# Altium PCB ads1299.PcbDoc (part 2 of 2)
Units mil, origin at the board's own origin, x right, y up, seen from the top; angles counter-clockwise.
Board outline 3937.01 x 3937.01 mil, 4 copper layers (Top Layer, internal_Layer 1, Internal_Layer 2, Bottom Layer), stack 23.756 mil thick; 175 components, 124 nets, 575 pads, 101 vias.
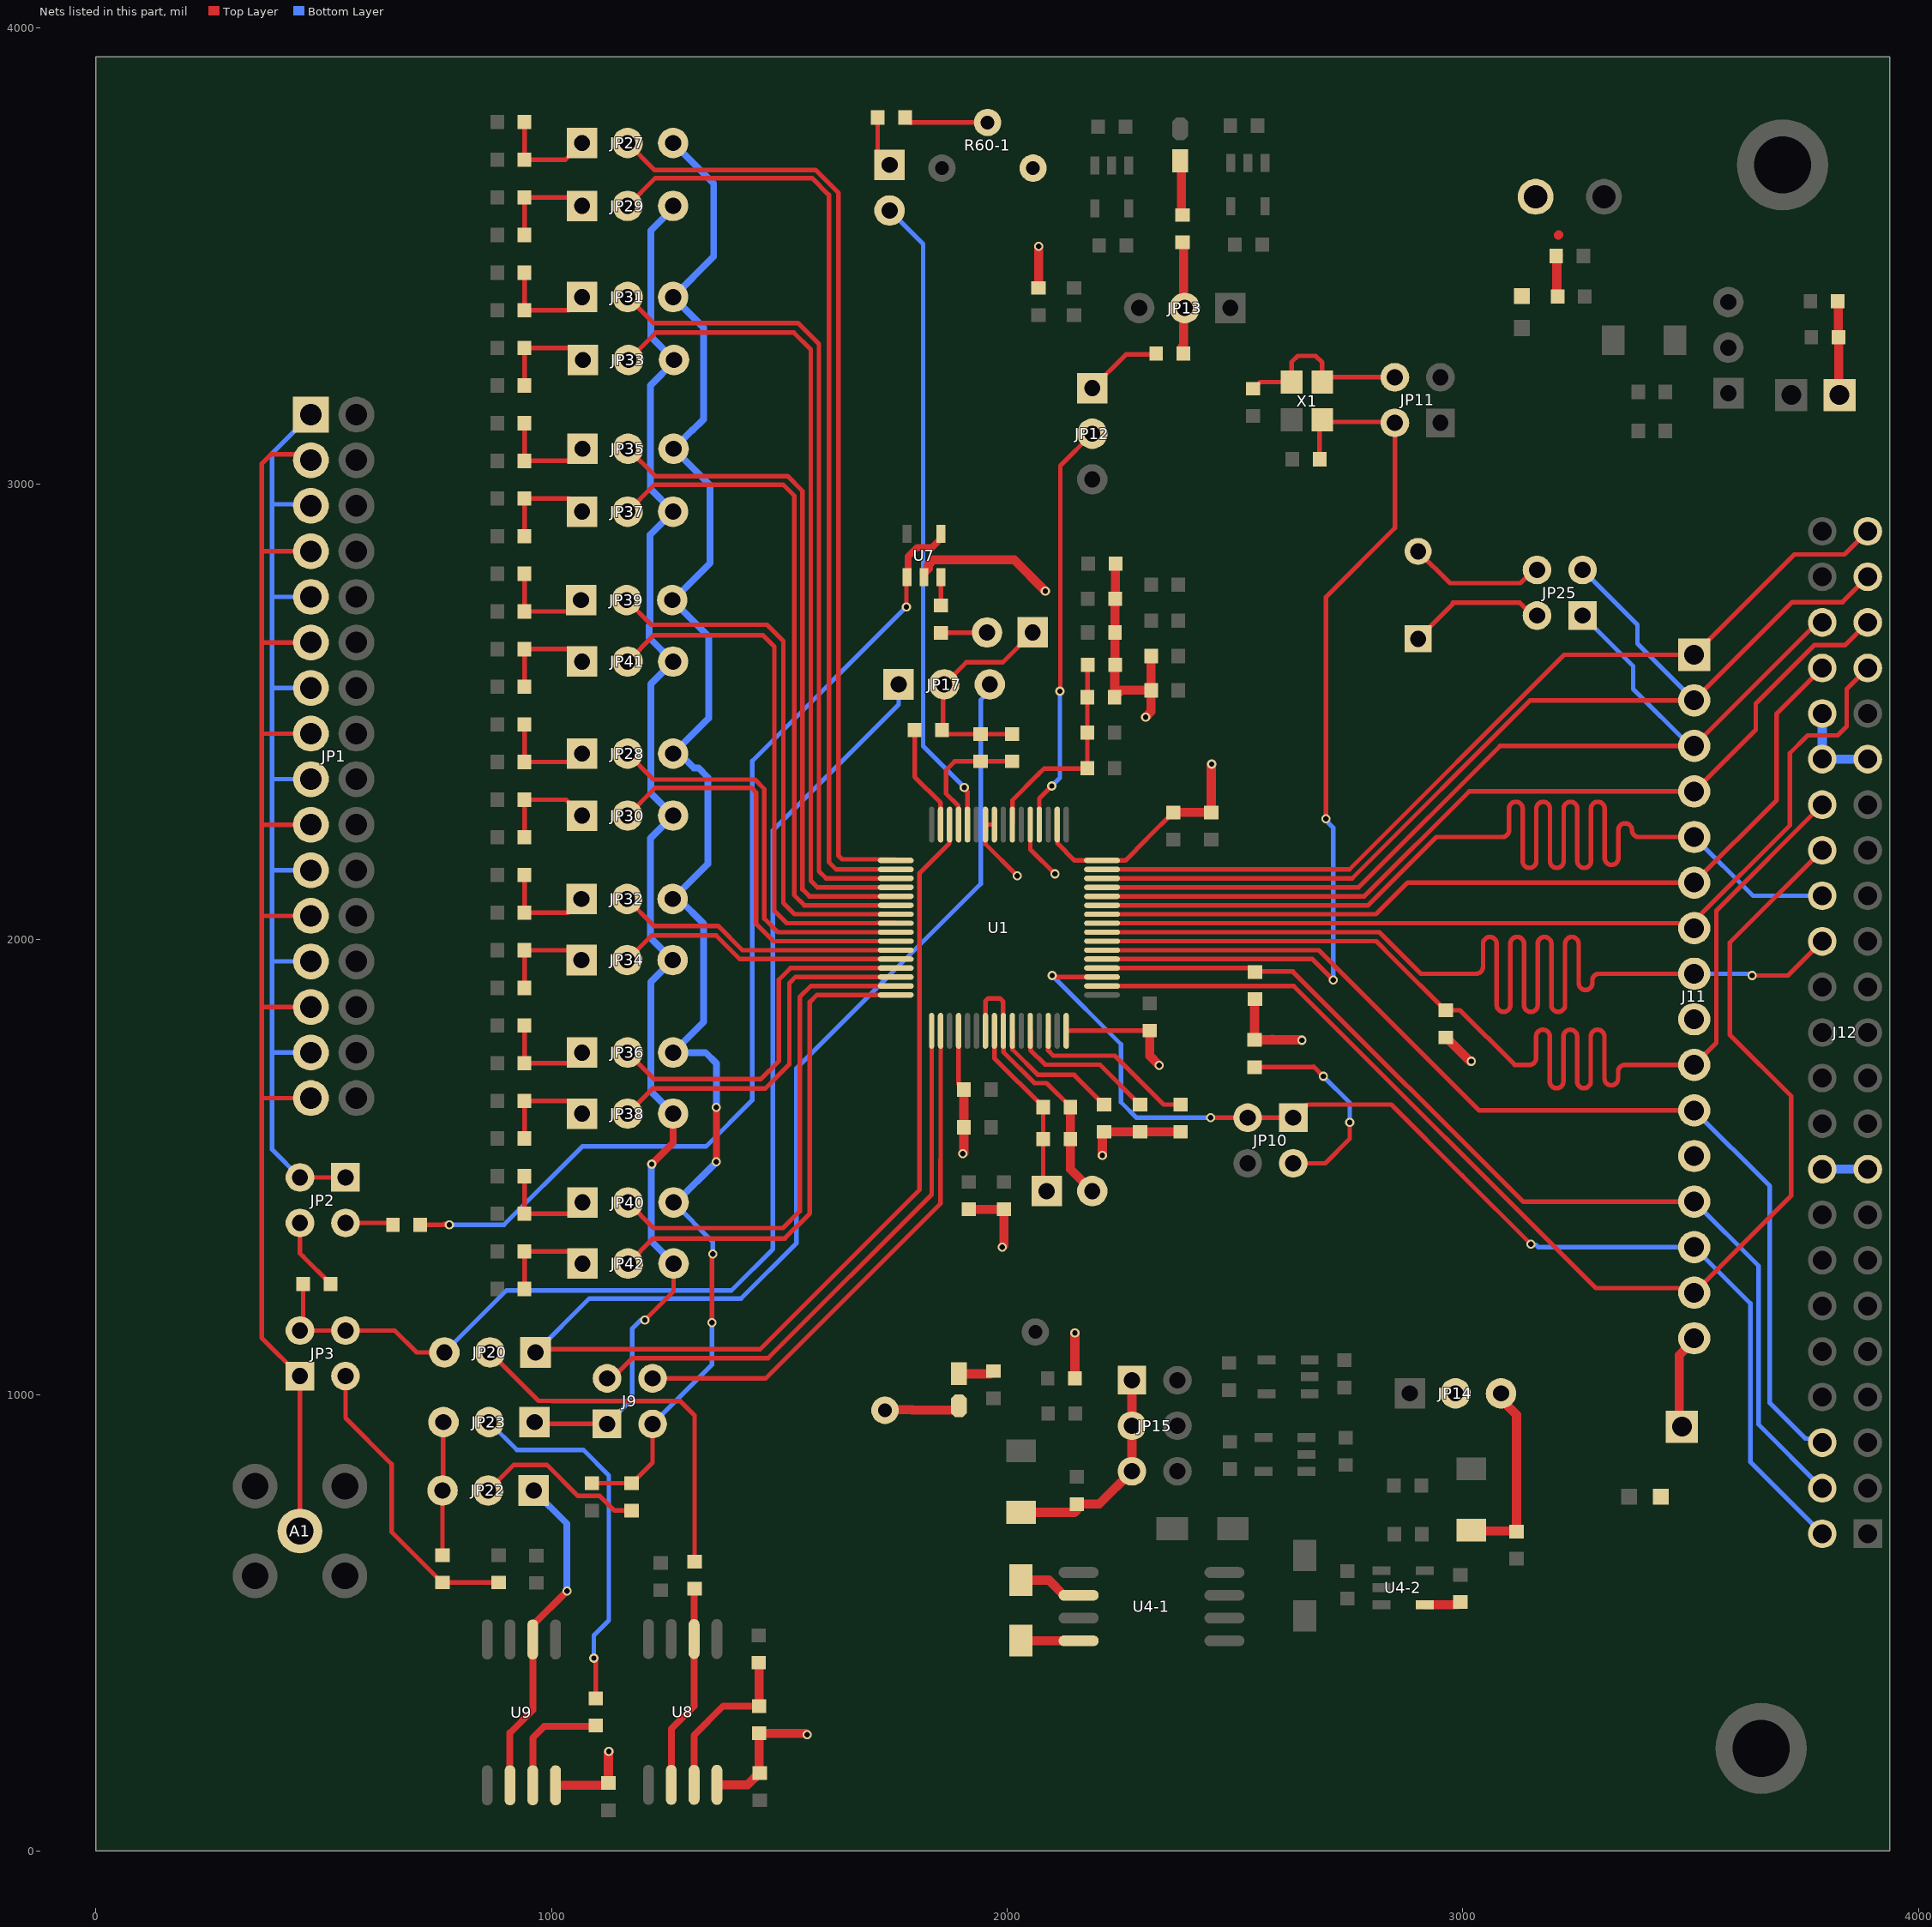
[diagram p4: the nets of this part, all layers, seen from the top]

## Via types
v1: diameter 20, hole 12, Top Layer to Bottom Layer, tented both sides, 86 vias
v2: diameter 20, hole 12, Top Layer to Bottom Layer, 15 vias

## Nets (pads, with @x,y where several pads share a name; then routed paths per layer and width w, separated by ;. In a path a pad name is that pad's centre, name@x,y a point inside that pad or via, vN(x,y) a via of type N, cw(c..) or ccw(c..) an arc to the next point about the centre after c; other vN are vias at no path point) (continued)
AVSS: C18.1 C19-1.1 C19-2.1 C21-1.1 C21-2.1 C23.1 C24.2 C25.1 C26.1 C28.1 C30.1 C32.2 C33.2 C53-1.1 C53-2.1 C55-3.2 C55-4.2 C56-1.1 C56-2.1 C62-2.1 C63-2.1 D2.K JP14.2 R60-1.3 R62-2.1 TP1.2 TP3.1 U1.20 U1.23 U1.25 U1.32 U1.53 U1.57 U1.58 U7.2 U8.4 U9.4 | length 3516.2
  Top Layer w10: U1.20@1893.42,1799.63 1893.42,1683.45 1905.08,1671.79 C19-1.1@1905.08,1671 ; U1.23@1952.47,1799.63 1952.47,1864.47 1959,1871 1984,1871 1991.49,1863.51 1991.49,1799.98 U1.25@1991.84,1799.63 1992.19,1799.28 1992.19,1753 2060.18,1685 2086.71,1685 2138.92,1632.79 C25.1@2138.92,1632 ; U1.57@1972.16,2252.37 U1.58@1952.47,2252.37 1952.56,2252.28 1952.56,2209.44 v1(2022,2140) ; U1.53@2050.9,2252.37 2050.9,2198.1 v1(2105,2144) ; U1.32@2129.64,1799.63 2140.32,1799.63 2140.84,1800.16 C33.2@2313,1800.16
  Top Layer w20: U9.4@1009,144 C62-2.1@1125.88,144 ; C62-2.1@1125,148.92 1125,217 v1(1126,218) ; U8.4@1363,145 1430.29,145 1456.21,170.92 C18.1@1457,170.92 ; 1455.5,187.42 1455.5,257.58 R62-2.1@1456,258.08 1557.92,258.08 v1(1561,255) ; TP3.1@1715,968 1791.65,968 1792,967.65 1886.76,967.65 1894.26,975.15 D2.K@1894.26,977 ; U7.2@1817.76,2805.2 1827.16,2814.6 1827.16,2822.65 1837.99,2833.48 2015.52,2833.48 v1(2084,2765) ; v1(1903,1530) 1905.08,1532.08 C19-2.1@1905.08,1588 C19-1.1@1905.08,1671 ; C21-1.1@1916,1408.08 C21-2.1@1993,1408.08 1993,1329 v1(1989,1325) ; C53-2.1@2069,3429.92 v1(2069,3521) ; C25.1@2138.92,1632 C24.2@2138.92,1562 2138.92,1496.08 TP1.2@2187,1448 ; C23.1@2148.92,1037 v1(2148.92,1136.92) ; v1(2209.15,1526.06) 2209.15,1574.23 C26.1@2213,1578.08 C28.1@2292,1578.08 C30.1@2381,1578.08 ; C55-4.2@2235.92,2532 2235.92,2532.79 C55-4.2@2236.42,2533.29 ; C56-1.1@2237.92,2825.79 C56-1.1@2237.92,2825 2237.42,2824.5 2237.42,2748.5 C56-2.1@2236.92,2748 C56-2.1@2236.92,2748 2236.88,2674.04 C53-1.1@2236.84,2674 2236.88,2673.96 C55-3.2@2236.92,2603 2236.42,2602.58 C55-4.2@2236.42,2533.29 ; v1(2304,2488) 2316.08,2500.08 C63-2.1@2316.08,2547 ; C33.2@2313,1800.16 2313,1745 v1(2334,1724) ; C32.2@2314.58,2623.5 C32.2@2316.08,2622 C63-2.1@2316.08,2547 ; C55-4.2@2236.42,2533.29 2240.88,2537.75 2241.67,2537.75 2250.92,2547 C63-2.1@2316.08,2547
BIAS: JP2.4 R62.1 | length 168.1
  Top Layer w10: JP2.4@443.46,1373.46 JP2.4@448,1378 448,1311.69 455.54,1304.15 514.92,1244.79 R62.1@514.92,1244
BIAS_DRV: C61.1 JP17.2 JP18.1 R61.2 R63-2.2 | length 501.2
  Top Layer w10: C61.1@2011,2450.92 R61.2@1942,2450.92 1866,2450.92 R63-2.2@1856.92,2460 1859.46,2462.54 1859.46,2557.46 JP17.2@1862,2560 1910.46,2608.46 1990.46,2608.46 JP18.1@2056,2674
BIAS_ELEC: JP3.2 JP3.4 JP17.1 JP20.3 R62.2 | length 2634.5
  Top Layer w10: R62.2@455.08,1244 455.08,1149.08 JP3.2@448,1142 JP3.4@548,1142 ; JP3.4@548,1156.34 JP3.4@548,1142 ; JP20.3@765,1094 704,1094 656,1142 JP3.4@548,1142
  Bottom Layer w10: JP20.3@765,1104 JP20.3@765,1094 901,1230 1395,1230 1486,1321 1486,2240.16 1762,2516.16 JP17.1@1762,2560
BIAS_SHD: R63.2 U7.1 U7.4 | length 2278.5
  Top Layer w10: R63.2@710.96,1373.04 R63.2@711.92,1374 763,1374 765,1376 765.09,1375.91 774.09,1375.91 v2(776,1374) ; v1(1779,2730) 1779,2794.32 U7.1@1780.2,2795.51
  Top Layer w15: U7.1@1780.2,2795.51 1782.54,2797.85 1782.54,2840.89 1802.14,2860.5 1835.34,2860.5 1852.66,2877.81 1852.66,2887.66 U7.4@1855,2890
  Bottom Layer w10: v2(776,1374) 895.85,1374 1067.85,1546 1339,1546 1441,1648 1441,2392 v1(1779,2730)
BIASIN: JP17.3 JP20.1 U1.62 | length 3893.5
  Top Layer w10: JP20.1@965,1094 972,1101 1458,1101 1808,1451 1808,2146.12 1872.96,2211.07 1872.96,2216.85 1873.38,2217.28 1873.38,2252.02 U1.62@1873.73,2252.37
  Bottom Layer w10: JP20.1@965,1094 1083,1212 1416,1212 1537.86,1333.86 1537.86,1717.86 1942,2122 1942,2525.68 1962,2545.68 JP17.3@1962,2560
BIASINV: C61.2 R61.1 U1.61 | length 283.9
  Top Layer w10: U1.61@1893.42,2252.37 1893.07,2252.72 1893.07,2287.46 1892.64,2287.9 1892.64,2293.67 1866,2320.3 1866,2372 1885.08,2391.08 R61.1@1942,2391.08 C61.2@2011,2391.08
BIASOUT: R63-2.1 U1.63 | length 231.2
  Top Layer w10: R63-2.1@1797.08,2460 1797.08,2356.92 1854.04,2299.96 U1.63@1854.05,2252.37
BIASREF: J16.2 U1.60 | length 1418.5
  Top Layer w10: v1(1906,2334) 1906,2331.29 1913.1,2324.19 U1.60@1913.1,2252.37
  Bottom Layer w10: J16.2@1742,3600 1815.54,3526.46 1815.54,2424.46 v1(1906,2334)
CLK: C37.2 JP11.2 U1.37 X1.3 | length 2044.3
  Top Layer w10: U1.37@2208.37,1957.1 2669.9,1957.1 v1(2716,1911) ; C37.2@2685.92,3054 2685.92,3135.12 X1.3@2691.46,3140.66 2696.13,3136 JP11.2@2826,3136 ; v1(2700,2265) 2700,2752.08 2851,2903.08 JP11.2@2851,3134
  Bottom Layer w10: v1(2700,2265) 2700,2262.29 2705,2257.29 2705,2256 2716,2245 v1(2716,1911)
CLKSEL: JP12.2 U1.52 | length 919.3
  Top Layer w10: U1.52@2070.58,2252.37 2070.58,2309.58 v1(2098,2337) ; v1(2116,2545) 2117,2546 2117,3040 JP12.2@2187,3110 ; JP12.2@2195,3090 JP12.2@2204.5,3099.5
  Bottom Layer w10: v1(2098,2337) 2116,2355 v1(2116,2545)
CS#: J11.10 J12.33 R39.2 U1.39 | length 2775
  Top Layer w10: U1.39@2208.37,1996.47 2809.99,1996.47 2848.1,1958.36 R39.2@2961.87,1844.58 ; R39.2@2963,1844.92 2994.08,1844.92 3114,1725 3141,1725 3146,1725 ccw(c3146,1740) 3161,1740 3161,1787.2 cw(c3176,1787.2) 3191,1787.2 3191,1688.8 ccw(c3206,1688.8) 3221,1688.8 3221,1787.2 cw(c3236,1787.2) 3251,1787.2 3251,1688.8 ccw(c3266,1688.8) 3281,1688.8 3281,1787.2 cw(c3296,1787.2) 3311,1787.2 3311,1695.08 ccw(c3326,1695.08) 3341,1695.08 3341,1710 cw(c3356,1710) 3356,1725 3413,1725 J11.10@3508,1725 ; J11.10@3519,1725 3519,1736 3556.43,1773.43 3556.43,2063.43 J12.33@3789,2296
  Bottom Layer w10: J12.33@3779.58,2286.58 J12.33@3789,2296
DAISY_IN: J11.7 J12.40 U1.41 | length 2071.6
  Top Layer w10: U1.41@2208.37,2035.84 3497.16,2035.84 J11.7@3508,2025 3508,2040.46 3718,2250.46 3718,2409 3757,2448 3823,2448 3842.81,2467.81 3842.81,2549.81 J12.40@3889,2596
DGND: C0-5.1 C0-6.1 J11.16 J12.17 J12.18 J12.35 J12.36 J12.37 J13-1.1 J13-2.1 L3.2 | length 730.9
  Top Layer w20: J13-2.1@3481,931 3475,937 3475,1087.85 3508,1120.85 J11.16@3508,1125 ; C0-5.1@3823,3401 3823.96,3400.04 3823.96,3322.96 C0-6.1@3824.92,3322 3824.92,3197.08 J13-1.1@3827,3195
  Bottom Layer w20: J13-2.1@3480,932 J13-2.1@3481,931 ; J12.17@3789,1484.37 J12.17@3789,1496 J12.18@3889,1496 ; J12.37@3789,2496 J12.35@3789,2396 J12.36@3889,2396
DIN: J11.15 J12.31 U1.34 | length 2777.6
  Top Layer w10: U1.34@2208.37,1898.05 2327.07,1898.05 ; 2327.08,1898.04 2628.96,1898.04 3292,1235 3498,1235 J11.15@3508,1225 3721,1438 3721,1656.21 3586,1791.21 3586,1993 J12.31@3789,2196
DOUT: J11.5 J12.29 U1.43 | length 2776
  Top Layer w10: U1.43@2208.37,2075.21 2792.21,2075.21 2942,2225 3081.5,2225 3086.5,2225 ccw(c3086.5,2240) 3101.5,2240 3101.5,2287.37 cw(c3116.5,2287.37) 3131.5,2287.37 3131.5,2172.07 ccw(c3146.5,2172.07) 3161.5,2172.07 3161.5,2287.37 cw(c3176.5,2287.37) 3191.5,2287.37 3191.5,2172.07 ccw(c3206.5,2172.07) 3221.5,2172.07 3221.5,2287.37 cw(c3236.5,2287.37) 3251.5,2287.37 3251.5,2172.07 ccw(c3266.5,2172.07) 3281.5,2172.07 3281.5,2287.37 cw(c3296.5,2287.37) 3311.5,2287.37 3311.5,2178.94 ccw(c3326.5,2178.94) 3341.5,2178.94 3341.5,2240 cw(c3356.5,2240) 3371.5,2240 ccw(c3386.5,2240) 3386.5,2225 3436,2225 J11.5@3508,2225
  Bottom Layer w10: J11.5@3508,2225 3637,2096 J12.29@3789,2096
DRDY#: J11.1 J12.46 U1.47 | length 1988
  Top Layer w10: U1.47@2208.37,2153.95 2751.49,2153.95 3222.54,2625 J11.1@3508,2625 3728,2845 3838,2845 J12.46@3889,2896
DVDD: C48-1.2 C49-1.2 J11.9 J11.12 JP13.2 R35.1 R36.2 R39.1 R48.2 R52.2 U1.48 U1.50 | length 1047.4
  Top Layer w10: U1.50@2109.95,2252.37 2110.3,2252.02 2110.3,2211.51 2148.17,2173.64 U1.48@2208.37,2173.64 2259.72,2173.64 2306.99,2220.91 2306.99,2221.69 2364.21,2278.92 C48-1.2@2365,2278.92
  Top Layer w20: C48-1.2@2365,2278.92 C49-1.2@2448,2278.92 2448,2384 v1(2449,2385) ; 2384.92,3302 2387.46,3304.54 2387.46,3383.46 JP13.2@2390,3386 2387.5,3388.5 2387.5,3527.66 R48.2@2385,3530.16 ; R36.2@2543,1868.08 R35.1@2543,1779.92 v1@2646.08,1779.92 ; 2582.08,1780.92 2583,1780 ; R39.1@2963,1785.08 2963.79,1785.08 3015.87,1733 v1(3019,1733)
  other v1: 2647,1779
GND_EXT: C0-3.1 C0-4.1 L2.1 Power.2 | length 95.9
  Top Layer w20: L2.1@3130,3412 L2.1@3130.5,3411.5 ; C0-4.1@3208.08,3411 3206.58,3412.5 3206.58,3499.29 C0-3.1@3210.04,3502.75 ; 3210.04,3545.75 3211,3546.71
GPIO1: J11.6 J12.39 U1.42 | length 1915.4
  Top Layer w10: U1.42@2208.77,2055.53 2809.53,2055.53 2879,2125 J11.6@3508,2125 3689,2306 3689,2496 J12.39@3789,2596
GPIO2: J11.4 J12.42 U1.44 | length 1963.6
  Top Layer w10: U1.44@2208.37,2094.9 2783.9,2094.9 3014,2325 J11.4@3508,2325 3643,2460 3643,2518 3771,2646 3839,2646 J12.42@3889,2696
GPIO3: J11.3 J12.41 JP25.1 U1.45 | length 2214.2
  Top Layer w10: U1.45@2208.37,2114.58 2771.58,2114.58 3082,2425 J11.3@3508,2425 3779,2696 J12.41@3789,2696
  Bottom Layer w10: JP25.1@3263,2711 3374,2600 3374,2550 3499,2425 J11.3@3508,2425
GPIO4: J11.2 J12.44 JP25.3 U1.46 | length 2342.2
  Top Layer w10: U1.46@2208.37,2134.27 2757.26,2134.27 3147.99,2525 J11.2@3508,2525 3723.5,2740.5 3833.5,2740.5 J12.44@3889,2796
  Bottom Layer w10: JP25.3@3263,2811 3383.32,2690.68 3383.32,2649.68 J11.2@3508,2525
IN1_N: JP40.2 U1.15 | length 1106.1
  Top Layer w10: JP40.2@1168,1423 1224,1367 1508,1367 1545,1404 1545,1874 1569.05,1898.05 U1.15@1755.63,1898.05
IN1_P: JP42.2 U1.16 | length 1103.6
  Top Layer w10: JP42.2@1168,1289 1223,1344 1512,1344 1567,1399 1567,1863 1582.36,1878.36 U1.16@1755.63,1878.36
IN2_N: JP36.2 U1.13 | length 818.3
  Top Layer w10: JP36.2@1167,1752 1225,1694 1460,1694 1499,1733 1499,1912 1524.42,1937.42 U1.13@1755.63,1937.42
IN2_P: JP38.2 U1.14 | length 817.3
  Top Layer w10: JP38.2@1167,1618 1222,1673 1469,1673 1522,1726 1522,1904.42 1535.31,1917.73 U1.14@1755.63,1917.73
IN3_N: JP32.2 U1.11 | length 636.1
  Top Layer w10: JP32.2@1166,2089 1225,2030 1365.92,2030 1419.13,1976.79 U1.11@1755.63,1976.79
IN3_P: JP34.2 U1.12 | length 633.5
  Top Layer w10: JP34.2@1166,1955 1220,2009 1361.47,2009 1413.37,1957.1 U1.12@1755.63,1957.1
IN4_N: JP28.2 U1.9 | length 917.6
  Top Layer w10: JP28.2@1167,2408 1224,2351 1446.46,2351 1467,2330.46 1467,2046 1496.84,2016.16 U1.9@1755.63,2016.16
IN4_P: JP30.2 U1.10 | length 922
  Top Layer w10: JP30.2@1167,2272 1228,2333 1439,2333 1449,2323 1449,2035 1487.53,1996.47 U1.10@1755.63,1996.47
IN5_N: JP39.2 U1.7 | length 1213
  Top Layer w10: JP39.2@1165,2745 1219,2691 1473,2691 1509,2655 1509,2080 1533.47,2055.53 U1.7@1755.63,2055.53
IN5_P: JP41.2 U1.8 | length 1254.9
  Top Layer w10: JP41.2@1167,2610 1225,2668 1464,2668 1489,2643 1489,2063 1516.16,2035.84 1715.62,2035.84 U1.8@1755.63,2035.84 1755.28,2036.19 1715.62,2036.19 1715.26,2036.55
IN6_N: JP35.2 U1.5 | length 1506.4
  Top Layer w10: JP35.2@1168,3077 1228,3017 1518,3017 1551,2984 1551,2110 1566,2095 1755.53,2095 U1.5@1755.63,2094.9
IN6_P: JP37.2 U1.6 | length 1509
  Top Layer w10: JP37.2@1167,2939 1226,2998 1509,2998 1533,2974 1533,2097 1554.79,2075.21 U1.6@1755.63,2075.21
IN7_N: JP31.2 U1.3 | length 1794.8
  Top Layer w10: JP31.2@1167,3410 1224,3353 1541,3353 1587,3307 1587,2150 1602.73,2134.27 U1.3@1755.63,2134.27
IN7_P: JP33.2 U1.4 | length 1798.8
  Top Layer w10: JP33.2@1169,3272 1229,3332 1532,3332 1569,3295 1569,2129 1583.42,2114.58 U1.4@1755.63,2114.58
IN8_N: JP27.2 U1.1 | length 2092.8
  Top Layer w10: JP27.2@1167,3748 1226,3689 1579.46,3689 1630,3638.46 1630,2184 1638,2176 1753.27,2176 U1.1@1755.63,2173.64
IN8_P: JP29.2 U1.2 | length 2099.9
  Top Layer w10: JP29.2@1167,3610 1228,3671 1572,3671 1609,3634 1609,2170 1625.05,2153.95 U1.2@1755.63,2153.95
IN+: A1.1 JP1.3 JP1.7 JP1.11 JP1.15 JP1.19 JP1.23 JP1.27 JP1.31 JP3.1 | length 3255
  Top Layer w10: A1.1@448,702 JP3.1@448,1042 364,1126 364,1652 ; JP1.31@472,1652 364,1652 ; JP1.27@472,1852 364,1852 ; JP1.23@472,2052 364,2052 ; JP1.19@472,2252 364,2252 ; JP1.15@472,2452 364,2452 ; JP1.11@472,2652 364,2652 ; JP1.7@472,2852 364,2852 ; JP1.3@472,3052 458.85,3065.15 385.15,3065.15 364,3044 364,2852 ; 364,1652 364,1852 ; 364,1852 364,2052 ; 364,2052 364,2252 ; 364,2252 364,2452 ; 364,2452 364,2652 ; 364,2652 364,2852
IN-: JP1.1 JP1.5 JP1.9 JP1.13 JP1.17 JP1.21 JP1.25 JP1.29 JP2.1 JP2.3 | length 2430.9
  Top Layer w10: JP2.3@448,1478 JP2.1@548,1478
  Bottom Layer w10: JP2.3@448,1478 387,1539 387,1752 ; JP1.29@472,1752 387,1752 ; JP1.25@472,1952 387,1952 ; JP1.21@472,2152 387,2152 ; JP1.17@472,2352 387,2352 ; JP1.13@472,2552 387,2552 ; JP1.9@472,2752 387,2752 ; JP1.5@472,2952 468.63,2955.37 387,2955.37 ; JP1.1@472,3152 387,3067 387,2955.37 ; 387,1752 387,1952 ; 387,1952 387,2152 ; 387,2152 387,2352 ; 387,2352 387,2552 ; 387,2552 387,2752 ; 387,2752 387,2955.37
NetC0-8_2: C0-8.2 JP15.1 JP15.3 JP15.5 L4.2 | length 484.6
  Top Layer w20: L4.2@2031,743 2147.79,743 C0-8.2@2159.79,755 ; C0-8.2@2153,761 2202,761 JP15.5@2274,833 JP15.3@2274,933 JP15.1@2274,1033
NetC0-10_2: C0-10.2 JP14.3 L5.2 | length 417.2
  Top Layer w20: L5.2@3019,703.5 3020.29,702.21 3116.71,702.21 C0-10.2@3118,700.92 3118,957.3 3084,991.3 JP14.3@3084,1004
NetC1-1_2: C1-1.2 JP27.1 R1-1.2 | length 223.9
  Top Layer w10: R1-1.2@940.92,3794 C1-1.2@940.92,3711.39 1030.39,3711.39 JP27.1@1067,3748
NetC2-1_1: C2-1.1 JP29.1 R2-1.2 | length 216.5
  Top Layer w10: R2-1.2@940.92,3546.16 C2-1.1@940.92,3628.77 1048.23,3628.77 JP29.1@1067,3610
NetC3-1_2: C3-1.2 JP31.1 R3-1.2 | length 220.7
  Top Layer w10: R3-1.2@940.92,3463.55 C3-1.2@940.92,3380.94 1037.94,3380.94 JP31.1@1067,3410
NetC4-1_1: C4-1.1 JP33.1 R4-1.2 | length 221.6
  Top Layer w10: R4-1.2@940.92,3215.71 C4-1.1@940.92,3298.32 1042.68,3298.32 JP33.1@1069,3272
NetC5-1_2: C5-1.2 JP35.1 R5-1.2 | length 220.7
  Top Layer w10: R5-1.2@940.92,3133.1 C5-1.2@940.92,3050.48 1041.48,3050.48 JP35.1@1068,3077
NetC6-1_1: C6-1.1 JP37.1 R6-1.2 | length 220.7
  Top Layer w10: R6-1.2@940.92,2885.26 C6-1.1@940.92,2967.87 1038.13,2967.87 JP37.1@1067,2939
NetC7-1_2: C7-1.2 JP39.1 R7-1.2 | length 217
  Top Layer w10: R7-1.2@940.92,2802.65 C7-1.2@940.92,2720.03 1040.03,2720.03 JP39.1@1065,2745
NetC8-1_1: C8-1.1 JP41.1 R8-1.2 | length 220
  Top Layer w10: R8-1.2@940.92,2554.81 C8-1.1@940.92,2637.42 1039.58,2637.42 JP41.1@1067,2610
NetC9-1_2: C9-1.2 JP28.1 R9-1.2 | length 216.3
  Top Layer w10: R9-1.2@940.92,2472.19 C9-1.2@940.92,2389.58 1048.58,2389.58 JP28.1@1067,2408
NetC10-1_1: C10-1.1 JP30.1 R10-1.2 | length 223.2
  Top Layer w10: R10-1.2@940.92,2224.35 C10-1.1@940.92,2306.97 1032.03,2306.97 JP30.1@1067,2272
NetC11-1_2: C11-1.2 JP32.1 R11-1.2 | length 220.1
  Top Layer w10: R11-1.2@940.92,2141.74 C11-1.2@940.92,2059.13 1036.13,2059.13 JP32.1@1066,2089
NetC12-1_1: C12-1.1 JP34.1 R12-1.2 | length 216.6
  Top Layer w10: R12-1.2@940.92,1893.9 C12-1.1@940.92,1976.52 1044.48,1976.52 JP34.1@1066,1955
NetC13-1_2: C13-1.2 JP36.1 R13-1.2 | length 218.4
  Top Layer w10: R13-1.2@940.92,1811.29 C13-1.2@940.92,1728.68 1043.68,1728.68 JP36.1@1067,1752
NetC14-1_1: C14-1.1 JP38.1 R14-1.2 | length 220.3
  Top Layer w10: R14-1.2@940.92,1563.45 C14-1.1@940.92,1646.06 1038.94,1646.06 JP38.1@1067,1618
NetC15-1_2: C15-1.2 JP40.1 R15-1.2 | length 220
  Top Layer w10: R15-1.2@940.92,1480.84 C15-1.2@940.92,1398.23 1043.23,1398.23 JP40.1@1068,1423
NetC16-1_1: C16-1.1 JP42.1 R16-1.2 | length 220.7
  Top Layer w10: R16-1.2@940.92,1233 C16-1.1@940.92,1315.61 1041.39,1315.61 JP42.1@1068,1289
NetC17_2: C17.2 JP3.3 R17.2 | length 664.6
  Top Layer w10: JP3.3@548,1042 548,950 649.13,848.87 649.13,700.17 760.21,589.08 R17.2@761,589.08 C17.2@884,589.08
NetC38_1: C38.1 JP11.4 X1.1 X1.4 | length 420.4
  Top Layer w10: C38.1@2540,3208.84 2540.79,3208.84 2555.28,3223.34 X1.1@2624.54,3223.34 2624.54,3267.54 2638,3281 2677,3281 2691.46,3266.54 X1.4@2691.46,3223.34 2702.13,3234 JP11.4@2851,3234
NetC57-1_1: C57-1.1 U4-1.2 | length 140.8
  Top Layer w20: C57-1.1@2030,594.39 2091.61,594.39 2125,561 U4-1.2@2157,561
NetC57-1_2: C57-1.2 U4-1.4 | length 127.3
  Top Layer w20: C57-1.2@2030,461.61 2030.61,461 U4-1.4@2157,461
NetC58-2_2: C58-2.2 U4-2.4 | length 80.9
  Top Layer w20: U4-2.4@2916.49,540.2 2988.33,540.2 2994.21,546.08 C58-2.2@2995,546.08
NetD1_A: D1.A R48.1 | length 121.2
  Top Layer w20: D1.A@2379.74,3709 2382.37,3706.38 2382.37,3592.63 R48.1@2385,3590
NetD2_A: D2.A R21.1 | length 78.2
  Top Layer w20: D2.A@1894.26,1047 1963.29,1047 1969.21,1052.92 R21.1@1970,1052.92
NetJ16_1: J16.1 R60-2.2 | length 114.7
  Top Layer w10: R60-2.2@1716.08,3804 1716.08,3725.92 J16.1@1742,3700
NetJP10_2: JP10.2 R35.2 | length 481.9
  Top Layer w10: R35.2@2543,1720.08 2671.92,1720.08 2672.92,1721.08 v1(2694,1700) ; JP10.2@2638.14,1498.86 JP10.2@2628,1509 2698,1509 2752,1563 v1(2752,1599)
  Bottom Layer w10: v1(2694,1700) 2752,1642 v1(2752,1599)
NetJP12_1: JP12.1 R52.1 | length 159.6
  Top Layer w10: JP12.1@2187,3210 2261,3284 R52.1@2315.99,3284
NetJP18_2: JP18.2 R63-1.2 | length 101.4
  Top Layer w10: R63-1.2@1855,2673.08 1855.46,2673.54 1955.54,2673.54 JP18.2@1956,2674
NetJP20_2: JP20.2 R62-3.2 | length 827.2
  Top Layer w10: JP20.2@865,1094 971.54,987.46 1001.85,987.46 1002.31,987 1283,987 1314,956 R62-3.2@1314,635
NetJP22_1: JP22.1 U9.2 U9.6 | length 728
  Top Layer w15: U9.2@909,144 909,259 959,309 959,495.5 1033.5,570 v1(1034,570)
  Bottom Layer w15: JP22.1@961,791 1034,718 v1@1034,571.35
NetJP22_2: JP22.2 R17-1.1 | length 389.5
  Top Layer w10: JP22.2@861,791 917,847 990.31,847 1058.31,779 1067.83,779 1067.87,778.96 1106.21,778.96 1138.09,747.08 R17-1.1@1176,747.08 R17-1.1@1183,740.08
NetJP23_2: JP23.2 R23.1 | length 815.9
  Top Layer w10: v1(1093,423) 1093,420.29 1097,416.29 R23.1@1097,334.92
  Bottom Layer w10: JP23.2@863,941 924.2,879.8 1070.2,879.8 1126,824 1126,506.15 1093,473.15 v1(1093,423)
NetR23_2: R23.2 U9.3 | length 252.4
  Top Layer w15: U9.3@959,144 959,248 984.08,273.08 R23.2@1097,273.08
NetR60-1_2: R60-1.2 R60-2.1 | length 186.1
  Top Layer w10: R60-2.1@1775.92,3804 1775.92,3803.21 1786.13,3793 R60-1.2@1957,3793
NetR62-1_1: R62-1.1 R62-2.2 U8.3 | length 374
  Top Layer w15: U8.3@1313,145 1313,254 1376.92,317.92 R62-2.2@1456,317.92
  Top Layer w20: R62-1.1@1455,413.08 1455.5,412.58 1455.5,318.42 R62-2.2@1456,317.92
NetR62-3_1: R62-3.1 U8.2 U8.6 | length 451.3
  Top Layer w15: U8.2@1263,145 1263,268 1313,318 U8.6@1313,465 1313.5,465.5 1313.5,574.66 R62-3.1@1314,575.16
NetR63-1_1: R63-1.1 U7.3 | length 62.6
  Top Layer w10: R63-1.1@1855,2732.92 U7.3@1855,2795.51
PACEOUT1/SRB1: J9.2 U1.17 | length 1238.7
  Top Layer w10: J9.2@1131.18,1046.18 1142.18,1046.18 1177.5,1081.5 1475.5,1081.5 1834.36,1440.36 U1.17@1834.36,1799.63
  Top Layer w15: J9.2@1122,1037 J9.2@1131.18,1046.18
PACEOUT2/SRB2: J9.4 U1.18 | length 1170
  Top Layer w10: J9.4@1222,1037 1470,1037 1854,1421 1854,1518.05 1854.36,1518.41 1854.36,1799.32 U1.18@1854.05,1799.63
PWDN#: J11.14 J12.1 JP10.1 JP10.3 U1.35 | length 2610.4
  Top Layer w10: v1(2099,1921) 2101.71,1921 2104.98,1917.73 U1.35@2208.37,1917.73 ; v1(2447,1609) JP10.3@2528,1609 JP10.1@2628,1609 2654.5,1635.5 2657.85,1635.5 2660.35,1638 2843.02,1638 2998.86,1482.15 v1(3149.55,1331.46)
  Bottom Layer w10: v1(2099,1921) 2250,1770 2250,1643 2284,1609 v1(2447,1609) ; v1(3149.55,1331.46) 3151.47,1329.55 3161.24,1329.55 3165.79,1325 J11.14@3508,1325 3631.25,1201.75 3631.25,853.75 J12.1@3789,696
REF_ELEC: JP22.3 JP23.3 R17.1 | length 292.9
  Top Layer w10: R17.1@761,648.92 JP22.3@761,791 762,792 762,940 JP23.3@763,941
RESET#: J11.13 J12.3 R36.1 U1.36 | length 2257.7
  Top Layer w10: U1.36@2208.37,1937.42 2535.5,1937.42 R36.1@2544,1928.92 ; R36.1@2544,1929.92 2627.08,1929.92 3132,1425 J11.13@3508,1425
  Bottom Layer w10: J11.13@3508,1425 3649.25,1283.75 3649.25,935.75 J12.3@3789,796
SCLK: J11.8 J12.27 U1.40 | length 2753.6
  Top Layer w10: U1.40@2208.37,2016.16 2816.84,2016.16 2908,1925 3024.5,1925 3029.5,1925 ccw(c3029.5,1940) 3044.5,1940 3044.5,1990.68 cw(c3059.5,1990.68) 3074.5,1990.68 3074.5,1856.34 ccw(c3089.5,1856.34) 3104.5,1856.34 3104.5,1990.68 cw(c3119.5,1990.68) 3134.5,1990.68 3134.5,1856.34 ccw(c3149.5,1856.34) 3164.5,1856.34 3164.5,1990.68 cw(c3179.5,1990.68) 3194.5,1990.68 3194.5,1856.34 ccw(c3209.5,1856.34) 3224.5,1856.34 3224.5,1990.68 cw(c3239.5,1990.68) 3254.5,1990.68 3254.5,1904.33 ccw(c3269.5,1904.33) 3284.5,1904.33 3284.5,1910 cw(c3299.5,1910) 3299.5,1925 3405,1925 J11.8@3507.68,1925 ; v1(3635,1921) 3714,1921 J12.27@3789,1996
  Bottom Layer w10: J11.8@3508,1925 3628.29,1925 3632.29,1921 v1(3635,1921)
SHD: JP2.2 R63.1 | length 109.9
  Top Layer w10: JP2.2@549.46,1376.54 JP2.2@548,1378 648.08,1378 R63.1@652.08,1374 ; R63.1@646.54,1371.54 R63.1@648,1370.08
SRB1: C17-2.2 J9.3 JP27.3 JP28.3 JP31.3 JP32.3 JP35.3 JP36.3 JP39.3 JP40.3 R17-1.2 | length 3666
  Top Layer w10: C17-2.2@1089,806.92 1175.92,806.92 1175.96,806.96 1176.83,806.96 1222,852.13 J9.3@1222,937 ; v2(1352,1159) 1352,1308 v2(1354,1310)
  Top Layer w15: v2(1362,1512) v2(1362,1632)
  Bottom Layer w10: J9.3@1222,937 1352,1067 v2(1352,1159) ; JP40.3@1268,1423 1354,1337 v2(1354,1310)
  Bottom Layer w15: JP27.3@1267,3748 1356,3659 1356,3499 JP31.3@1267,3410 1334,3343 1334,3141.79 1310.09,3117.87 1308.87,3117.87 JP35.3@1268,3077 1348,2997 1348,2826 1267,2745 JP39.3@1265,2745 1345,2665 1345,2486 JP28.3@1267,2408 1281.05,2408 1312.2,2376.85 1322.36,2376.85 1343,2356.21 1343,2166 JP32.3@1266,2089 1280,2089 1334,2035 1334,1819 JP36.3@1267,1752 1338,1752 1362,1728 v2(1362,1632) ; JP40.3@1268,1423 1273,1423 v2(1362,1512)
SRB2: J9.1 JP23.1 JP29.3 JP30.3 JP33.3 JP34.3 JP37.3 JP38.3 JP41.3 JP42.3 | length 3189.1
  Top Layer w10: JP23.1@967,937 J9.1@1122,937 ; v2(1205,1165) 1268,1228 JP42.3@1268,1289
  Top Layer w15: JP23.1@963,941 JP23.1@967,937 ; v2(1220,1507) 1267,1554 JP38.3@1267,1618
  Bottom Layer w10: J9.1@1122,937 1177.5,992.5 1177.5,1146.5 1196.36,1165.36 1204.64,1165.36 v2(1205,1165)
  Bottom Layer w15: v2(1220,1507) 1220,1500 1219.04,1499.04 1219.04,1337.96 JP42.3@1268,1289 ; JP38.3@1267,1618 1218.04,1666.96 1218.04,1907.04 JP34.3@1266,1955 1217,2004 1217,2222 JP30.3@1267,2272 1218,2321 1218,2561 JP41.3@1267,2610 1214,2663 1214,2688 1216.04,2690.04 1216.04,2888.04 JP37.3@1267,2939 1217,2989 1217,3216 1269,3268 JP33.3@1269,3272 1218.04,3322.96 1218.04,3556.04 1267,3605 JP29.3@1267,3610
START: J11.11 J12.5 U1.38 | length 2310.8
  Top Layer w10: U1.38@2208.37,1976.79 2684.27,1976.79 3036.06,1625 J11.11@3508,1625 J11.11@3505.42,1627.58
  Bottom Layer w10: J11.11@3508,1625 3674,1459 3674,983 3752.12,904.88 3780.12,904.88 J12.5@3789,896
VCAP1: C28.2 U1.28 | length 332.5
  Top Layer w10: U1.28@2050.9,1799.63 2051.25,1799.28 2051.25,1757.67 2083.65,1725.26 2203.87,1725.26 2291.21,1637.92 C28.2@2292,1637.92
VCAP2: C30.2 U1.30 | length 383.1
  Top Layer w10: U1.30@2090.27,1799.63 2090.27,1756.29 2101.29,1745.26 2236.58,1745.26 2343.92,1637.92 C30.2@2381,1637.92
VCAP3: C55-1.2 C55-2.2 C55-3.1 C55-4.1 U1.55 | length 474.8
  Top Layer w10: U1.55@2011.53,2252.37 2011.88,2252.72 2011.88,2305.87 2068.24,2362.23 2081.22,2375.21 2176.08,2375.21 C55-2.2@2176.08,2376 C55-1.2@2176.08,2454 C55-4.1@2176.08,2532 ; C55-4.1@2176.58,2532.5 C55-3.1@2176.58,2602.5
  Top Layer w20: C55-4.1@2176.08,2532 C55-4.1@2176.58,2532.5 ; C55-3.1@2176.58,2602.5 C55-3.1@2177.08,2603
VCAP4: C26.2 U1.26 | length 292.2
  Top Layer w10: U1.26@2011.53,1799.63 2011.88,1799.28 2011.88,1758.76 2067.64,1703 2147.13,1703 2212.21,1637.92 C26.2@2213,1637.92
VREFP: C24.1 C25.2 TP1.1 U1.24 | length 399.2
  Top Layer w10: U1.24@1972.16,1799.63 1972.16,1739.71 2079.08,1632.79 C25.2@2079.08,1632 C24.1@2079.08,1562 2079.08,1455.92 TP1.1@2087,1448
X2-1: JP25.2 X2.1 | length 307.3
  Top Layer w10: X2.1@2902,2659.94 2978,2735.94 2978,2739.14 3125.39,2739.14 3153.53,2711 JP25.2@3163,2711
X2-2: JP25.4 X2.2 | length 302
  Top Layer w10: X2.2@2902,2852.06 2972.06,2782 3126.24,2782 3155.24,2811 JP25.4@3163,2811
pads on no net: J12.2 J12.4 J12.6 J12.7 J12.8 J12.9 J12.10 J12.11 J12.12 J12.13 J12.14 J12.15 J12.16 J12.19 J12.20 J12.21 J12.22 J12.23 J12.24 J12.25 J12.26 J12.28 J12.30 J12.32 J12.34 J12.38 J12.43 U1.27 U1.29 U4-1.1 U4-1.7 U8.1 U8.5 U8.8 U9.1 U9.5 U9.8

## Polygon pours and split planes (outlines as drawn)
+5V_EXT on Top Layer "+5V_EXT_L01_P012" (solid, remove dead copper, pour order 12): 3357.03,3379 3643,3379 3643,3474 3359,3474 3358,3475
+5V_EXT on Top Layer "+5V_EXT_L01_P010" (solid, remove dead copper, pour order 10): 3250,3682 3247,3679 3247,3378 3379,3378 3379,3681.06
AGND on Top Layer "AGND_L01_P000" (solid, remove dead copper, pour order 0): 1724.64,1247.37 3310.13,1247.37 3391.51,1165.99 3391.51,396.99 3296.76,302.24 1709.68,302.24 1665.51,386.61 1665.51,1188.24
DGND on Top Layer "DGND_L01_P008" (solid, remove dead copper, pour order 8): 3601,1139 3613,1139 3625,1139 3704,1139 3704,615 3422,615 3422,1139
DGND on Top Layer "DGND_L01_P007" (solid, pour order 7): 3658,3457.58 3937.01,3457.58 3937.01,615 3658,615
AGND on Top Layer "AGND_L01_P006" (solid, remove dead copper, pour order 6): 3029,3362 3243,3362 3243,3215 3029,3215
GND_EXT on Top Layer "GND_EXT_L01_P005" (solid, pour order 5): 3241,3684 3237,3680 3237,3376 3093,3376 3093,3403 3093,3684
+5V on Top Layer "+5V_L01_P004" (solid, remove dead copper, pour order 4): 3254,3367 3409,3367 3409,3056 3252,3056 3252,3368
AGND on internal_Layer 1 (split plane): 3916.91,20.1 20.1,20.1 20.1,3916.91 3916.91,3916.91
AVSS on Internal_Layer 2 (split plane): 197 vertices, not listed, extent 20.1,20.1 3418.44,3916.91
AVDD on Internal_Layer 2 (split plane): 1942.44,3264 1942.69,3262.04 1943.45,3260.22 1944.65,3258.65 1946.22,3257.45 1948.04,3256.69 1950,3256.44 2231.21,3256.44 2232.21,3255.13 2233.78,3253.93 2235.6,3253.17 2237.56,3252.92 2239.52,3253.17 2241.34,3253.93 2242.91,3255.13 2243.91,3256.44 2418.44,3256.44 2418.44,2907 2418.69,2905.04 2419.45,2903.22 2420.65,2901.65 2422.22,2900.45 2422.44,2900.36 2422.44,2814.56 2007,2814.56 2005.04,2814.31 2003.22,2813.55 2001.65,2812.35 2000.45,2810.78 1999.69,2808.96 1999.44,2807 1999.44,2641.56 1999.44,2396.12 1999.69,2394.16 2000.14,2393.09 2000.45,2392.34 2001.65,2390.77 2030.99,2361.43 2030.99,2213.56 1972,2213.56 1970.04,2213.31 1968.22,2212.55 1966.65,2211.35 1965.45,2209.78 1964.69,2207.96 1964.44,2206 1964.44,1973 1964.69,1971.04 1965.45,1969.22 1966.65,1967.65 1968.22,1966.45 1970.04,1965.69 1972,1965.44 2021.44,1965.44 2021.44,1643.56 1560,1643.56 1558.04,1643.31 1556.22,1642.55 1554.65,1641.35 1553.45,1639.78 1552.69,1637.96 1552.44,1636 1552.44,1044 1552.44,915 1552.69,913.04 1553.14,911.97 1553.45,911.22 1554.65,909.65 1570.65,893.65 1572.22,892.45 1574.04,891.69 1574.27,891.66 1576,891.44 1833.44,891.44 1833.44,806 1833.69,804.04 1834.44,802.25 1834.44,312.68 1649.12,315.56 1649.04,315.55 1648.95,315.56 832.64,310.57 832.55,310.78 831.35,312.35 829.78,313.55 827.96,314.31 826,314.56 731.56,314.56 731.56,3614.87 858.13,3741.44 1942.44,3741.44
+5V on Internal_Layer 2 (split plane): 3916.91,20.1 3433.56,20.1 3433.56,1173 3433.31,1174.96 3432.55,1176.78 3431.35,1178.35 3429.78,1179.55 3427.96,1180.31 3426,1180.56 2844,1180.56 2842.04,1180.31 2840.22,1179.55 2838.65,1178.35 2837.45,1176.78 2836.69,1174.96 2836.44,1173 2836.44,940 2836.69,938.04 2837.14,936.97 2837.45,936.22 2838.65,934.65 2850.65,922.65 2852.22,921.45 2852.97,921.14 2854.04,920.69 2856,920.44 3062.44,920.44 3062.44,410.56 2329.56,410.56 2329.56,1059.93 2330.55,1061.22 2331.31,1063.04 2331.56,1065 2331.56,1383.44 2577,1383.44 2578.96,1383.69 2580.78,1384.45 2582.35,1385.65 2583.55,1387.22 2584.31,1389.04 2584.56,1391 2584.31,1392.91 2584.55,1393.22 2585.31,1395.04 2585.56,1397 2585.56,1550.44 2826.44,1550.44 2826.44,1470 2826.5,1469.5 2826.44,1469 2826.69,1467.04 2827.45,1465.22 2828.65,1463.65 2830.22,1462.45 2832.04,1461.69 2834,1461.44 3646,1461.44 3680,1461.44 3681.96,1461.69 3683.78,1462.45 3685.35,1463.65 3686.55,1465.22 3687.31,1467.04 3687.56,1469 3687.56,1763 3687.56,2884 3687.31,2885.96 3686.55,2887.78 3685.35,2889.35 3683.78,2890.55 3681.96,2891.31 3680,2891.56 3041.56,2891.56 3041.56,3567 3041.31,3568.96 3040.55,3570.78 3039.35,3572.35 3037.78,3573.55 3035.96,3574.31 3034,3574.56 2239.56,3574.56 2237.16,3574.56 2237.16,3916.91 3916.91,3916.91
DVDD on Internal_Layer 2 (split plane): 3026.44,2884 3026.69,2882.04 3027.45,2880.22 3028.65,2878.65 3030.22,2877.45 3032.04,2876.69 3034,2876.44 3672.44,2876.44 3672.44,1763 3672.44,1476.56 3646,1476.56 2841.56,1476.56 2841.56,1558 2841.31,1559.96 2840.55,1561.78 2839.35,1563.35 2837.78,1564.55 2835.96,1565.31 2834,1565.56 2491.56,1565.56 2491.56,1847 2491.56,2252 2491.31,2253.96 2490.55,2255.78 2489.35,2257.35 2487.78,2258.55 2485.96,2259.31 2484,2259.56 2316.56,2259.56 2316.56,2428.44 2505,2428.44 2506.96,2428.69 2508.78,2429.45 2510.35,2430.65 2511.55,2432.22 2512.31,2434.04 2512.56,2436 2512.56,2595.25 2513.31,2597.04 2513.56,2599 2513.56,2732 2513.31,2733.96 2512.55,2735.78 2511.35,2737.35 2509.78,2738.55 2507.96,2739.31 2506,2739.56 2437.56,2739.56 2437.56,2907 2437.31,2908.96 2436.55,2910.78 2435.35,2912.35 2433.78,2913.55 2433.56,2913.64 2433.56,3264 2433.31,3265.96 2432.55,3267.78 2431.35,3269.35 2429.78,3270.55 2427.96,3271.31 2426,3271.56 2245.12,3271.56 2245.12,3559.44 3026.44,3559.44

## Other copper
internal_Layer 1 (plane layer: these items are gaps in the copper):
  lines w15: -44,66 66,-44 ; 3839,1449 3840,1448
Internal_Layer 2 (plane layer: these items are gaps in the copper):
  lines w15: 826,307 724,307 724,3618 855,3749 1950,3749 1950,3264 2426,3264 2426,2907 ; 831,303 1649,308 1842,305 1842,817 ; 1841,806 1841,899 1576,899 1560,915 1560,1044 1560,1636 1915,1636 2029,1636 2029,1973 1972,1973 1972,2206 2038.56,2206 2038.56,2364.56 2007,2396.12 2007,2641.56 2007,2807 2430,2807 ; 1946.13,2199.66 1952.47,2206 ; 1988,3933 2215,3933 2229.6,3918.4 2229.6,3567 2361,3567 2822,3567 3034,3567 3034,2884 3680,2884 3680,1763 3680,1469 3646,1469 2834,1469 ; 2010,3931 3936,3931 3936,3847 3936,1368 3936,64 3936,0 3935,-1 3360,-1 ; 2011,3931 -5,3931 -5,1 3111,1 ; 2237.56,3260.48 2237.56,3565.48 ; 2237.56,3566 2238.56,3566 2239.56,3567 ; 2322,1072 2322,403 3070,403 3070,928 2856,928 2844,940 2844,1173 3426,1173 3426,0 3115,0 ; 2324,1065 2324,1391 2577,1391 ; 2430,2907 2430,2732 2506,2732 2506,2599 ; 2505,2599 2505,2436 2309,2436 2309,2252 2484,2252 2484,1847 2484,1558 2685,1558 ; 2578,1397 2578,1551 ; 2678,1558 2834,1558 2834,1470

## Silkscreen, mask and mechanical layers (free items; w line width, h text height)
Top Overlay:
  drawing of 588 lines, arcs and shapes, not listed
  text "2" at 1154.98,3822 h30
  text "1" at 1052,3821 h30
  text "3" at 1271,3821.33 h30
  text "+5V" at 3484,3589 h40 r90
  text "GND" at 3032,3577.49 h40 r90
  text "2" at 1156.98,3523 h30
  text "1" at 1054,3522 h30
  text "3" at 1273,3522.33 h30
  text "2" at 1154.98,3476 h30
  text "1" at 1052,3475 h30
  text "3" at 1271,3475.33 h30
  text "+5V_EXT" at 3516,3466 h30
  text "3" at 2293,3450 h40
  text "1" at 2453,3450 h40
  text "2" at 2374,3449 h40
  text "3" at 3661,3393 h40
  text "LHE7909-X / Demoboard / 2023-04" at 175,3363 h60
  text "DVDD=3.3V" at 2471,3304.33 h30
  text "DVDD=1.8V" at 2146,3303 h30
  text "2" at 3658,3283 h40
  text "CLKSEL=1" at 1990,3202.31 h30
  text "2" at 1154.98,3186 h30
  text "1" at 1052,3185 h30
  text "3" at 1271,3185.33 h30
  text "1" at 2261,3177 h40
  text "1" at 3658,3176.65 h40
  text "IN8_N" at 644,3145.32 h30
  text "2" at 1152.98,3143 h30
  text "1" at 1050,3142 h30
  text "3" at 1269,3142.33 h30
  text "+5V_Ctrl" at 3525,3104 h30
  text "2" at 2260,3093 h40
  text "IN8_P" at 646,3042.32 h30
  text "3" at 2261,2996 h40
  text "CLKSEL=0" at 1993,2985.31 h30
  text "45" at 3757.5,2958.48 h40
  text "46" at 3849,2958.48 h40
  text "IN7_N" at 642,2944.32 h30
  text "2" at 1152.98,2850 h30
  text "1" at 1050,2849 h30
  text "3" at 1269,2849.33 h30
  text "IN7_P" at 644,2841.32 h30
  text "2" at 1152.98,2810 h30
  text "1" at 1050,2809 h30
  text "3" at 1269,2809.33 h30
  text "IN6_N" at 638,2744.32 h30
  text "BIASINV" at 2048.69,2742 h30 r90
  text "BIAS_SHD" at 1940.68,2740 h30 r90
  text "IN6_P" at 644,2639.32 h30
  text "DRDY#" at 3343,2617.33 h30
  text "IN5_N" at 642,2547.32 h30
  text "BIASIN" at 2047.69,2526 h30 r90
  text "2" at 1147.98,2522 h30
  text "1" at 1045,2521 h30
  text "3" at 1264,2521.33 h30
  text "GPIO4" at 3350,2519.31 h30
  text "BIAS_ELEC" at 1689.68,2490 h30 r90
  text "2" at 1152.98,2475 h30
  text "1" at 1050,2474 h30
  text "3" at 1269,2474.33 h30
  text "IN5_P" at 644,2440.32 h30
  text "GPIO3" at 3351,2416.33 h30
  text "IN4_N" at 644,2349.32 h30
  text "GPIO2" at 3355,2322 h30
  text "IN4_P" at 642,2244.32 h30
  text "DOUT" at 3351,2219.31 h30
  text "2" at 1156.98,2188 h30
  text "1" at 1054,2187 h30
  text "3" at 1273,2187.33 h30
  text "2" at 1156.98,2153 h30
  text "1" at 1054,2152 h30
  text "3" at 1273,2152.33 h30
  text "IN3_N" at 640,2146.32 h30
  text "GPIO1" at 3351,2115.31 h30
  text "IN3_P" at 642,2046.32 h30
  text "DAISY_IN" at 3328,2021.32 h30
  text "IN2_N" at 640,1941.32 h30
  text "SCLK" at 3362,1921.31 h30
  text "2" at 1149.98,1870 h30
  text "1" at 1047,1869 h30
  text "3" at 1266,1869.33 h30
  text "IN2_P" at 638,1841.32 h30
  text "2" at 1145.98,1820 h30
  text "1" at 1043,1819 h30
  text "3" at 1262,1819.33 h30
  text "DVDD" at 3365,1807 h30
  text "IN1_N" at 638,1737.32 h30
  text "CS#" at 3376,1720.33 h30
  text "IN1_P" at 646,1634.32 h30
  text "START" at 3349,1629.31 h30
  text "2" at 1152.98,1531 h30
  text "1" at 1050,1530 h30
  text "3" at 1269,1530.33 h30
  text "DVDD" at 3349,1519 h30
  text "2" at 1151.34,1487.36 h30
  text "3" at 1267.36,1486.69 h30
  text "1" at 1048.36,1486.36 h30
  text "RESET#" at 3333,1416.33 h30
  text "PWDN#" at 3333,1300.33 h30
  text "DIN" at 3372,1216 h30
  text "2" at 1160.98,1204 h30
  text "1" at 1058,1203 h30
  text "3" at 1277,1203.33 h30
  text "BIAS_ELEC" at 615,1165 h30
  text "BIAS_ELEC" at 233,1156 h30
  text "DGND" at 3360,1100.31 h30
  text "+" at 1880,1093 h30
  text "AGND" at 2836,1065.31 h30
  text "-2.5V" at 3070,1065.31 h30
  text "REF_ELEC" at 505,943 h30
  text "2" at 2432.98,929 h30
  text "+" at 2640,704 h30
  text "+" at 2551,702 h30
  text "1" at 959,691 h40
  text "3" at 746,690 h40
  text "2" at 857,689 h40
  text "+" at 2016,651 h30
  text "1" at 3770,543 h40
  text "2" at 3870,543 h40
Mechanical 1:
  the board outline again, w10

## Text inside footprints (layer, text, board x,y; h text height)
J9: Top Overlay "SRB2" at 1073,852 h30; Top Overlay "OUT1" at 1073,1105 h30; Top Overlay "OUT2" at 1221,1105 h30; Top Overlay "SRB1" at 1197,855 h30
JP2: Top Overlay "IN-" at 605,1544 h30; Top Overlay "SHD" at 597,1301.31 h30; Top Overlay "BIAS" at 323,1309.31 h30; Top Overlay "IN-" at 355,1542 h30
JP3: Top Overlay "IN+" at 422,940 h30
JP10: Top Overlay "PWDN" at 2434,1670 h30; Top Overlay "AGND" at 2448,1414 h30; Top Overlay "DVDD" at 2631,1416 h30; Top Overlay "PWDN" at 2624.54,1671 h30
JP11: Top Overlay "EN" at 2770,3303 h30; Top Overlay "+3.3V" at 2980,3309.33 h30; Top Overlay "AGND" at 2999,3042.31 h30; Top Overlay "CLK" at 2770,3042.31 h30
JP15: Top Overlay "3" at 2433,822.33 h30; Top Overlay "1" at 2435,1026 h30
JP25: Top Overlay "X2-2" at 3164,2871.02 h30 r90; Top Overlay "X2-1" at 3166,2581 h30 r90; Top Overlay "GPIO3" at 3280,2548 h30 r90; Top Overlay "GPIO4" at 3269.69,2872 h30 r90